# Altium PCB ChrisByrd-IoT_Product.PcbDoc (part 6 of 6)
Units mil, origin at the board's own origin, x right, y up, seen from the top; angles counter-clockwise.
Board outline 5314.96 x 4000 mil, 2 copper layers (Top Layer, Bottom Layer), stack 57 mil thick; 306 components, 230 nets, 1006 pads, 531 vias.
Unrouted connection lines stored in the file: 476.
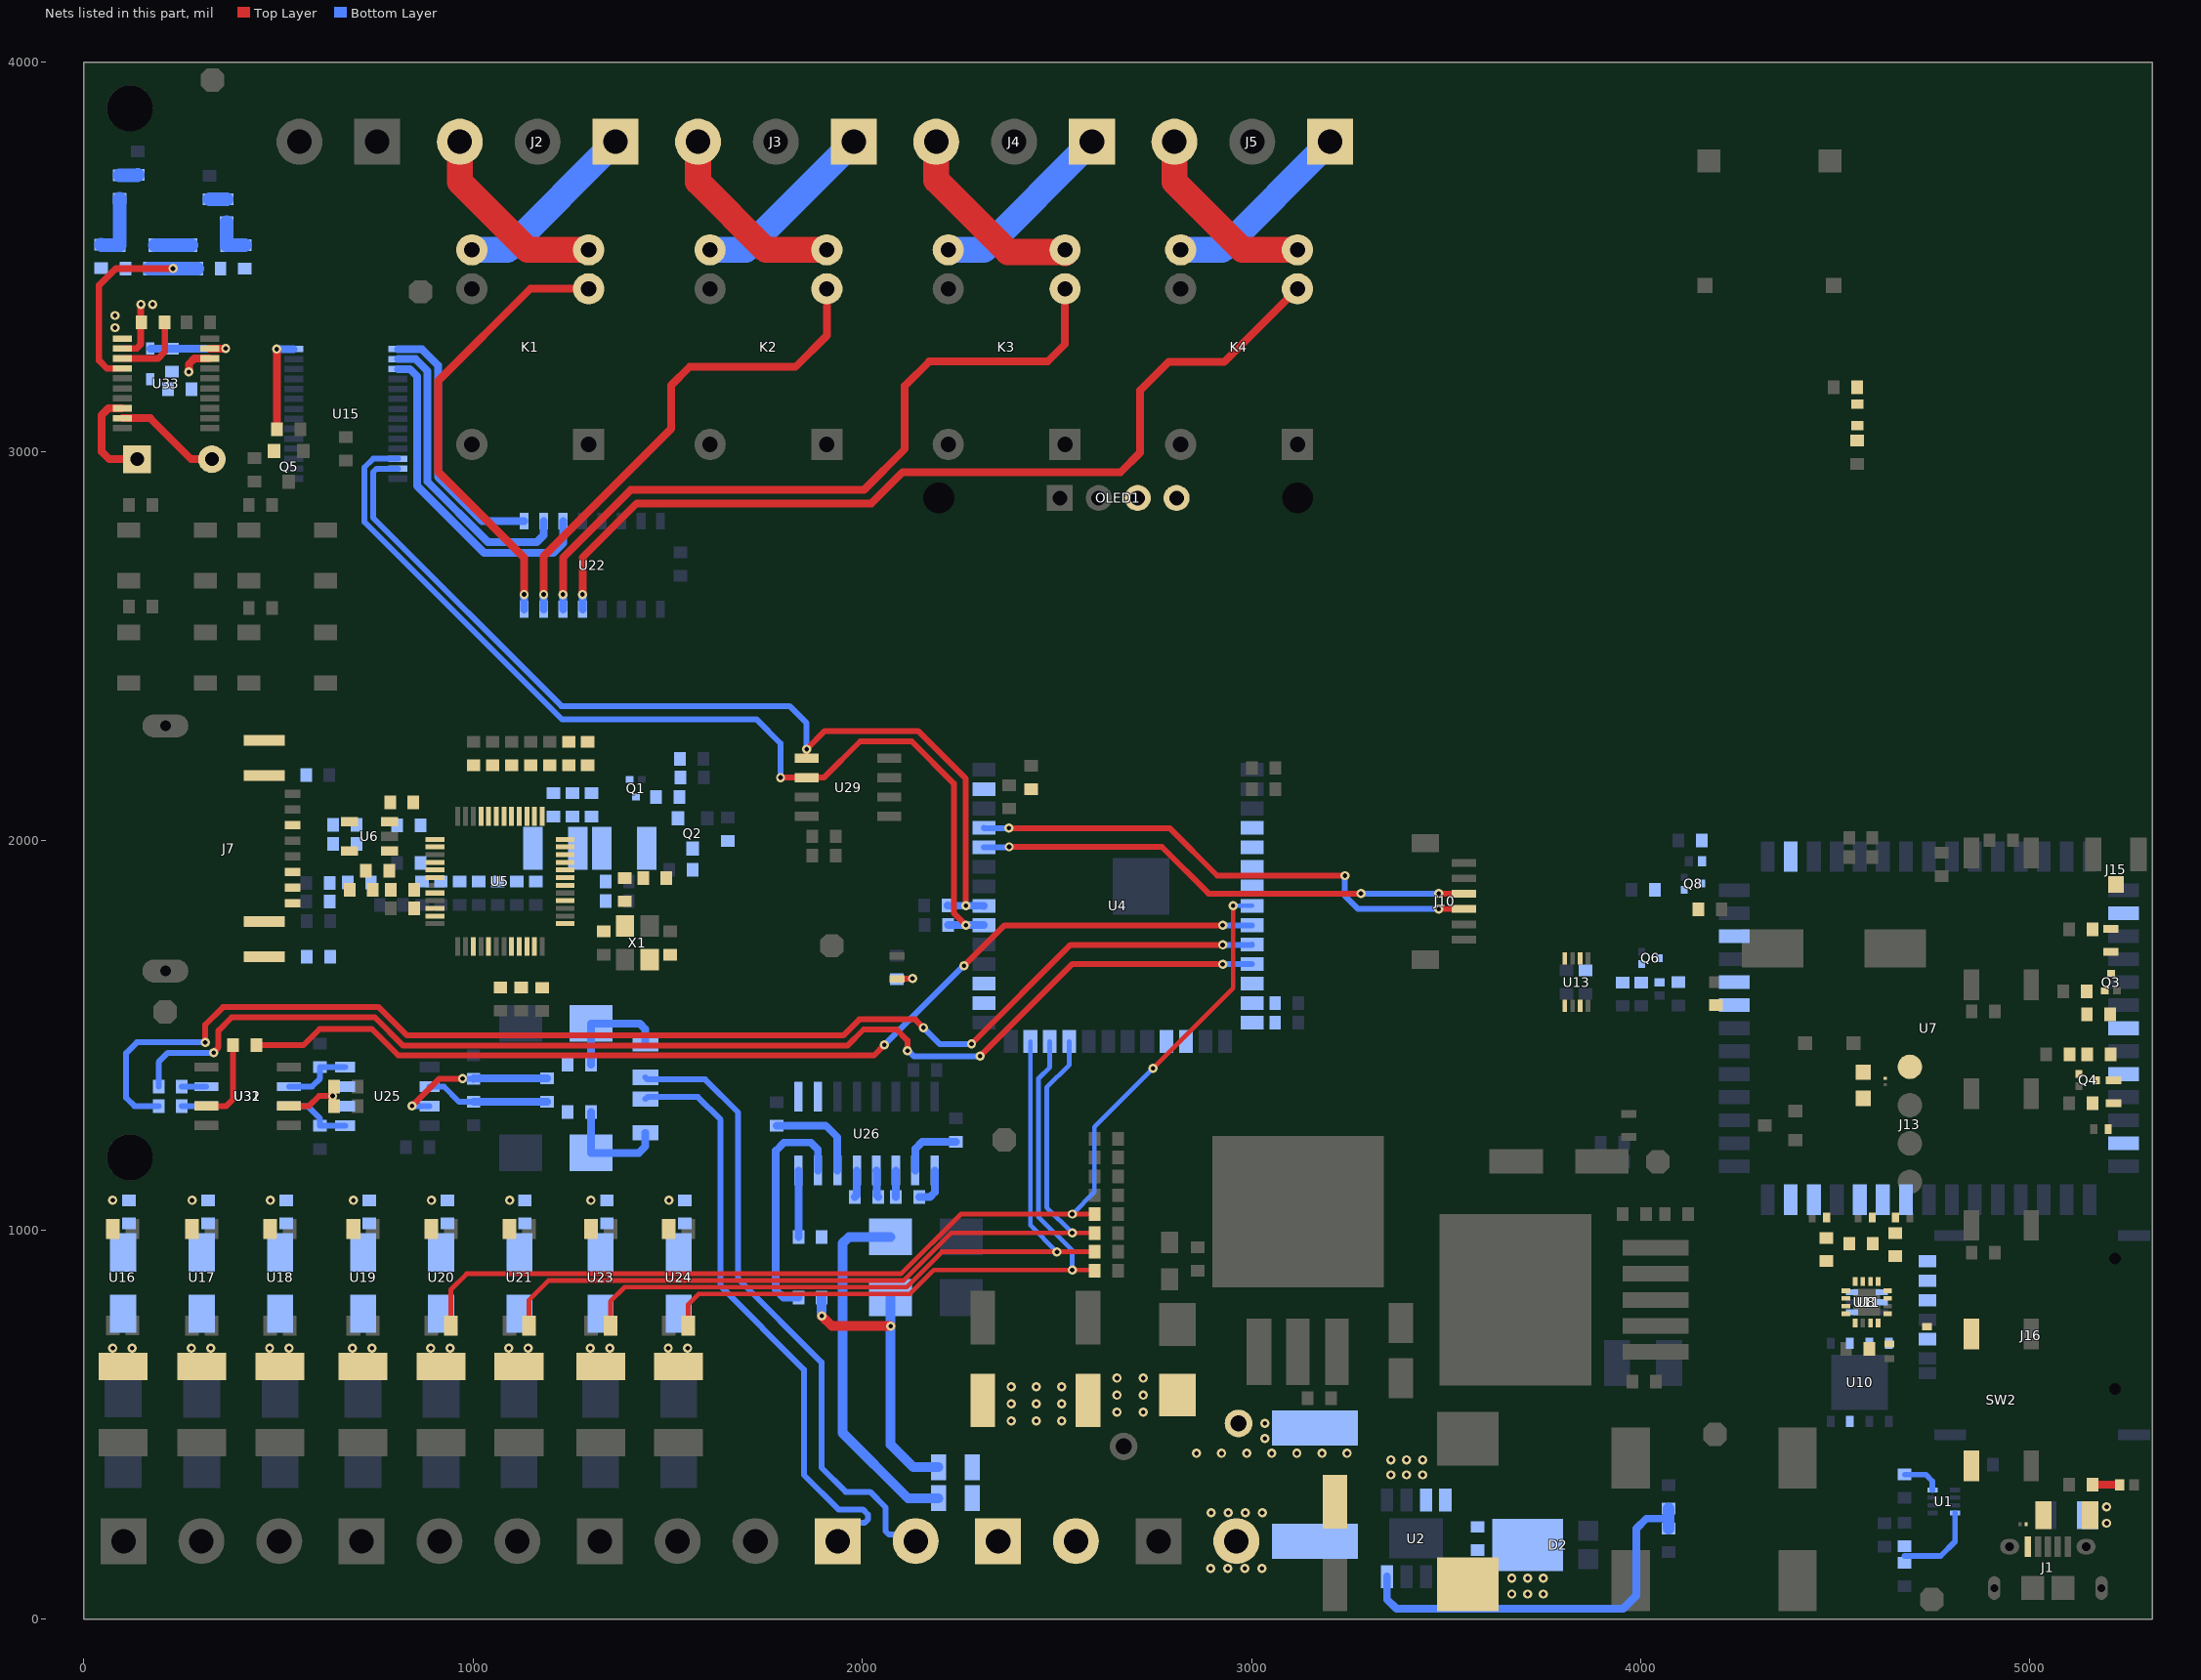
[diagram p3: the nets of this part, all layers, seen from the top]

## Via types
v1: diameter 23.62, hole 11.81, Top Layer to Bottom Layer, 531 vias

## Nets (pads, with @x,y where several pads share a name; then routed paths per layer and width w, separated by ;. In a path a pad name is that pad's centre, name@x,y a point inside that pad or via, vN(x,y) a via of type N, cw(c..) or ccw(c..) an arc to the next point about the centre after c; other vN are vias at no path point) (continued)
IO5: R88.2 U4.8 U20.4 | length 2839.1
  Top Layer w12: U20.4@943,753.97 943,846.7 983.3,887 2099.86,887 2253.14,1040.29 v1(2539.41,1040.29) R88.2@2597.02,1040.29 ; v1(2747,1415) 2953,1621 v1(2953,1832.61)
  Bottom Layer w12: v1(2539.41,1040.29) 2596.49,1097.37 2596.49,1264.49 v1(2747,1415) ; v1(2953,1832.61) U4.8@3001.49,1832.61
IO6: R89.2 U4.23 U21.4 | length 2132.8
  Top Layer w12: U21.4@1144,753.97 1144,819.7 1194.3,870 2106.9,870 2228.75,991.86 v1(2539.41,991.86) R89.2@2597,991.86
  Bottom Layer w12: U4.23@2531.8,1483.39 2531.8,1423.55 2473.8,1365.55 2473.8,1057.47 v1(2539.41,991.86)
IO7: R93.2 U4.25 U23.4 | length 1927.1
  Top Layer w12: U23.4@1353,753.97 1353,816.25 1389.75,853 2113.94,853 2204.37,943.43 v1@2500,943.43 ; v1(2500.11,943.43) R93.2@2597,943.43
  Bottom Layer w12: U4.25@2431.8,1483.39 2431.8,1011.74 v1(2500.11,943.43)
IO8: R94.2 U4.24 U24.4 | length 1770.8
  Top Layer w12: U24.4@1553,753.97 1553,808.7 1579.54,835.24 2122.37,835.24 2184,896.88 v1(2539.41,896.88) 2595.12,896.88 R94.2@2597,895
  Bottom Layer w12: U4.24@2481.8,1483.39 2481.8,1417.37 2452.42,1387.99 2452.42,1033.61 2539.41,946.63 v1(2539.41,896.88)
LAN_ACT: J7.11 R21.1
LAN_LINK: J7.9 R20.1
LEARN: C15.2 C16.1 SW2.3 SW2.4 U4.39
LED_DATA: Q5.2 R110.2 U15.28 | length 249.5
  Top Layer w20: v1(495.95,3263.03) 496.21,3262.77 496.21,3057.54 R110.2@496.46,3057.28
  Bottom Layer w20: v1(495.95,3263.03) U15.28@539.46,3263.03
LINKLED: R20.2 U5.25
MCU_RX: U4.28 U13.8
MCU_TX: U4.29 U13.1
MUX/ENCRYP_SCL: R62.1 U4.32 U15.12 U29.6 | length 2626.2
  Top Layer w15: v1(1790.07,2162) U29.6@1857,2162 1901.48,2162 1994.48,2255 2127.02,2255 2235.12,2146.9 2235.12,1813.94 v1(2266.26,1782.8)
  Bottom Layer w15: U15.12@807.18,2981.53 743.53,2981.53 721,2959 721,2819 1229,2311 1729,2311 1790.07,2249.93 v1(1790.07,2162)
  Bottom Layer w20: R62.1@2220,1783 2220.2,1782.8 v1(2266.26,1782.8) 2312.31,1782.8 U4.32@2312.51,1782.61
MUX/ENCRYP_SDA: R63.1 U4.33 U15.13 U29.5 | length 2505.7
  Top Layer w15: U29.5@1857,2212 v1(1857,2235) 1904,2282 2143,2282 2266,2159 v1(2266,1832.8)
  Bottom Layer w15: U15.13@807.18,2955.94 752.32,2955.94 743.53,2947.16 743.53,2829.47 1227,2346 1813,2346 1857,2302 v1(1857,2235)
  Bottom Layer w20: R63.1@2219.49,1832.99 2219.68,1832.8 v1(2266,1832.8) 2312.32,1832.8 U4.33@2312.51,1832.61
NC_1: J2.1 K1.4 | length 484.2
  Bottom Layer w66.93: K1.4@997,3518 1088,3518 J2.1@1366,3796
NC_2: J3.1 K2.4 | length 484.2
  Bottom Layer w66.93: K2.4@1609,3518 1700,3518 J3.1@1978,3796
NC_3: J4.1 K3.4 | length 484.2
  Bottom Layer w66.93: K3.4@2221,3518 2312,3518 J4.1@2590,3796
NC_4: J5.1 K4.4 | length 499.2
  Bottom Layer w66.93: K4.4@2818,3518 2924,3518 J5.1@3202,3796
NetC3_1: C3.1 D2.2 L1.1 U2.8
  other v1: 3668.74,64 3709.24,64 3749.74,64 3668.74,105 3709.24,105 3749.74,105
NetC3_2: C3.2 U2.1
NetC19_1: C19.1 Q2.1 R6.1 R7.1
NetC20_2: C20.2 FB2.1 Q2.3 R8.1
NetC30_2: C30.2 R15.1 R18.2
NetC31_2: C31.2 R17.1 R19.2
NetC34_2: C34.2 U5.22
NetC35_2: C35.2 U5.20
NetC36_2: C36.2 R25.1 U5.30 X1.1
NetC37_2: C37.2 R26.1 X1.3
NetC41_2: C41.2 R36.2 U7.10
NetC49_1: C49.1 U7.55
NetC50_1: C50.1 R68.1 | length 47.4
  Bottom Layer w35: R68.1@92,3710 138,3710 C50.1@139,3711
NetC51_1: C51.1 R75.1 | length 44
  Bottom Layer w35: C51.1@323,3648.61 R75.1@367,3648.61
NetC55_2: C55.2 R37.1 U7.11
NetC56_2: C56.2 R39.2 U7.13
NetC59_1: C59.1 U26.4 | length 70
  Bottom Layer w20: U26.4@2036.06,1152.43 2036.89,1151.61 2036.89,1088.68 C59.1@2041.06,1084.51
NetC59_2: C59.2 U26.5 | length 70
  Bottom Layer w20: C59.2@1981.06,1084.51 1985.23,1088.68 1985.23,1151.61 U26.5@1986.06,1152.43
NetC60_1: C60.1 U26.1 | length 101.1
  Bottom Layer w20: C60.1@2146.06,1084.5 2174.34,1084.51 2186.06,1096.22 U26.1@2186.06,1152.43
NetC60_2: C60.2 U26.3 | length 67.9
  Bottom Layer w20: C60.2@2086.06,1084.5 U26.3@2086.06,1152.43
NetC61_1: C61.1 U26.6 | length 254.1
  Bottom Layer w20: C61.1@1780,1268 1906.06,1268 1936.06,1238 U26.6@1936.06,1152.43
NetC62_1: C62.1 U26.2 | length 167.8
  Bottom Layer w20: U26.2@2136.06,1152.43 2136.06,1208.06 2153.99,1225.99 C62.1@2240.81,1225.99
NetD1_1: D1.1 F1.1 J1.1
NetD4_2: D4.2 F14.2 R100.1 | length 933.7
  Bottom Layer w25: D4.2@2072.88,981.77 1966.06,981.77 1949,964.7 1949,478.7 2117.43,310.27 F14.2@2195.97,310.27
NetD5_1: D5.1 R72.2
NetD5_2: D5.2 R70.2 U33.19 | length 234.8
  Top Layer w20: U33.19@323.45,3264.5 v1(364.43,3264.52)
  Bottom Layer w20: D5.2@170.63,3264.49 R70.2@226.23,3264.52 ; R70.2@226.23,3264.52 v1(364.43,3264.52)
NetD9_1: D9.1 D10.1 | length 94.2
  Bottom Layer w35: D9.1@182.22,3530 D10.1@276.45,3530
NetD9_2: D9.2 R68.2 R69.1 | length 167.3
  Bottom Layer w35: R69.1@44.98,3530.99 45.75,3530.22 91.45,3530.22 D9.2@91.66,3530 91.78,3530 92,3530.22 R68.2@92,3650
NetD10_2: D10.2 R75.2 R76.1 | length 104.6
  Bottom Layer w35: R75.2@367,3588.61 D10.2@367,3530 R76.1@413,3530
NetD11_2: D11.2 F27.2 R101.1 | length 759.6
  Top Layer w25: v1(1896,778.47) 1921.76,752.71 v1(2072.88,752.71)
  Bottom Layer w25: v1(1896,778.47) R101.1@1896,825.71 ; D11.2@2072.88,825.71 v1(2072.88,752.71) 2072.88,448.13 2131.19,389.82 F27.2@2195.97,389.82
NetD12_2: D12.2 F28.1 R102.2 | length 288.1
  Bottom Layer w20: R102.2@1303.09,1424.63 1303.09,1529.54 D12.2@1303.55,1530 1428.3,1530 1442.02,1516.28 1442.02,1479.28 F28.1@1443,1478.31
NetD13_2: D13.2 F30.1 R103.2 | length 286.1
  Bottom Layer w20: R103.2@1303.09,1302.24 1303.09,1197.71 D13.2@1303.24,1197.56 1425.56,1197.56 1443,1215 F30.1@1443,1249.34
NetD14_1: D14.1 F2.1
  other v1: 74.4,696 124.4,696
NetD14_2: D14.2 R77.2
NetD16_1: D16.1 F3.1
  other v1: 276.41,695.7 326.41,695.7
NetD16_2: D16.2 R80.2
NetD19_1: D19.1 F5.1 J13.1
NetD20_1: D20.1 F6.1
  other v1: 477.41,695.7 527.41,695.7
NetD20_2: D20.2 R81.2
NetD22_1: D22.1 F7.1
  other v1: 690.41,695.7 740.41,695.7
NetD22_2: D22.2 R82.2
NetD24_1: D24.1 F8.1
  other v1: 891.41,695.7 941.41,695.7
NetD24_2: D24.2 R83.2
NetD26_1: D26.1 F9.1
  other v1: 1091.41,695.7 1141.41,695.7
NetD26_2: D26.2 R84.2
NetD28_1: D28.1 F10.1
  other v1: 1301.41,695.7 1351.41,695.7
NetD28_2: D28.2 R85.2
NetD30_1: D30.1 F11.1
  other v1: 1501.41,695.7 1551.41,695.7
NetD30_2: D30.2 R86.2
NetF1_2: F1.2 FB1.1
  other v1: 5197,246 5197,287.79
NetF4_1: F4.1 J12.2
  other v1: 2895.24,130 2939.12,130 2983,130 3026.88,130 2896,273 2939.88,273 2983.76,273 3027.64,273
NetL2_1: L2.1 R64.1
NetL2_2: L2.2 SB1.1
NetLED1_1: LED1.1 R4.2 | length 69.9
  Top Layer w20: R4.2@5160.26,344.7 LED1.1@5230.13,344.69
NetLED2_1: LED2.1 R40.2
NetLED2_2: LED2.2 Q3.3
NetLED3_1: LED3.1 R43.2
NetLED3_2: LED3.2 Q4.3
NetLED6_2: LED6.2 R92.2 | length 81.3
  Top Layer w15: LED6.2@2089,1644.47 2089.64,1645.11 2128.36,1645.11 v1(2129,1645.75)
  Bottom Layer w15: R92.2@2089,1644 2089.88,1644.88 2128.12,1644.88 v1(2129,1645.75)
NETLIGHT: R44.1 U7.52
NetQ1_3: Q1.3 R6.2
NetQ3_1: Q3.1 R41.2 R42.2
NetQ4_1: Q4.1 R44.2 R45.2
NetQ6_1: Q6.1 R47.2 R48.2
NetQ8_1: Q8.1 R50.2 R51.2
NetR1_1: R1.1 U1.8 | length 101.1
  Bottom Layer w14: R1.1@4677.9,371 4732.1,371 4749.19,353.91 U1.8@4749.19,331.22
NetR12_2: R12.2 U5.2
NetR13_2: R13.2 U5.1
NetR15_2: R15.2 U5.6
NetR17_2: R17.2 U5.5
NetR22_1: R22.1 U5.43
NetR23_1: R23.1 U5.44
NetR24_1: R24.1 U5.45
NetR25_2: R25.2 R26.2 U5.31
NetR27_2: R27.2 U5.38
NetR28_2: R28.2 U5.39
NetR29_2: R29.2 U5.40
NetR30_2: R30.2 U5.41
NetR31_2: R31.2 U5.42
NetR32_2: R32.2 U5.23
NetR33_2: R33.2 U5.10
NetR52_1: R52.1 R53.2 U2.4 | length 1041.2
  Bottom Layer w20: U2.4@3348,108.67 3348,50.47 3372.25,26.22 3954.97,26.22 3989,60.25 3989,232.32 4014.58,257.9 4072,257.9
  Bottom Layer w30: R53.2@4072,231.8 4072,257.9 R52.1@4072,284
NetR58_1: R58.1 R99.2 R102.1 U25.7 | length 421.6
  Top Layer w15: v1(843,1318) 913.51,1388.51 v1(973.12,1388.51)
  Bottom Layer w15: v1(843,1318) U25.7@888.27,1318 ; v1(973.12,1388.51) R99.2@1001.28,1388.51
  Bottom Layer w20: R99.2@1001.28,1388.51 1001.58,1388.8 1189.6,1388.8 R58.1@1189.89,1389.09
NetR58_2: R58.2 R103.1 R104.1 U25.6 | length 317.7
  Bottom Layer w15: U25.6@888.27,1368 925.28,1368 964.16,1329.12 R104.1@1001.28,1329.15
  Bottom Layer w20: R104.1@1001.28,1329.15 R58.2@1189.89,1329.09
NetR69_2: R69.2 R73.1 U33.1
  other v1: 80.54,3317.98 80.54,3349.5
NetR70_1: R70.1 R72.1 U33.18 | length 79.7
  Top Layer w20: v1(269.95,3204.28) 269.95,3224.56 284.29,3238.9 U33.18@323.44,3238.9
NetR74_1: R74.1 R76.2 R109.1 U33.2 | length 154.6
  Top Layer w17: U33.2@99.03,3264.49 99.26,3264.72 135.99,3264.72 146.39,3275.12 v1@146.39,3378
  other v1: 147,3378 177,3378
NetR77_1: R77.1 U16.2
  other v1: 74.4,1076
NetR80_1: R80.1 U17.2
  other v1: 278,1075.7
NetR81_1: R81.1 U18.2
  other v1: 479,1075.7
NetR82_1: R82.1 U19.2
  other v1: 692.68,1075.7
NetR83_1: R83.1 U20.2
  other v1: 893,1075.7
NetR84_1: R84.1 U21.2
  other v1: 1094,1075.7
NetR85_1: R85.1 U23.2
  other v1: 1303,1075.7
NetR86_1: R86.1 U24.2
  other v1: 1503,1075.7
NetR100_2: R100.2 U26.8 | length 170.7
  Bottom Layer w20: R100.2@1836,981.77 U26.8@1836.03,1152.4
NetR101_2: R101.2 U26.7 | length 602.1
  Bottom Layer w20: R101.2@1836,825.71 1797.57,825.71 1777.88,845.4 1777.88,1202.94 1799.13,1224.19 1868.14,1224.19 1886.06,1206.27 U26.7@1886.06,1152.43
NetR105_1: R105.1 U31.2 | length 62.6
  Bottom Layer w15: R105.1@252,1318 U31.2@314.63,1318
NetR106_1: R106.1 U31.3 | length 62.6
  Bottom Layer w15: R106.1@252,1368 U31.3@314.63,1368
NetR108_1: R108.1 U32.7 | length 214.6
  Top Layer w15: U32.7@314.64,1318 366.27,1318 383,1334.72 R108.1@383,1474
NetR109_2: R109.2 U33.3 | length 192.1
  Top Layer w17: U33.3@99.03,3238.9 191.03,3238.9 208,3255.86 R109.2@208,3332
NetU33_8: U33.8 X2.1 | length 253.3
  Top Layer w20: U33.8@99.03,3110.94 63.44,3110.94 45.94,3093.44 45.94,2999.65 65.59,2980 X2.1@136.94,2980
NetU33_9: U33.9 X2.2 | length 273.7
  Top Layer w20: U33.9@99.03,3085.35 170.63,3085.35 275.99,2980 X2.2@329.06,2980
NO_1: J2.3 K1.3 | length 491.7
  Top Layer w66.93: J2.3@966,3796 966,3692.65 1140.65,3518 K1.3@1282,3518
NO_2: J3.3 K2.3 | length 491.7
  Top Layer w66.93: J3.3@1578,3796 1578,3692.65 1752.65,3518 K2.3@1894,3518
NO_3: J4.3 K3.3 | length 507.4
  Top Layer w66.93: J4.3@2190,3796 2190,3697 2374.27,3512.73 2518.44,3512.73 K3.3@2521,3510.17
NO_4: J5.3 K4.3 | length 491.7
  Top Layer w66.93: J5.3@2802,3796 2802,3692.65 2976.65,3518 K4.3@3118,3518
OLED_SCL: OLED1.3 R91.1 U4.13
OLED_SDA: OLED1.4 R90.1 U4.14
PR1: R2.1 R3.2 U1.4 | length 218.1
  Bottom Layer w15: 4677.9,162 4770.54,162 4807.46,198.91 U1.4@4807.46,272.16
PWRKEY: C44.2 D8.2 Q8.3 U7.30
RD_N: C31.1 J7.6 U6.1
RD_P: C30.1 J7.3 U6.5
RE/DE/RS485: R108.2 U4.9 | length 2741.6
  Top Layer w15: R108.2@443,1474 564,1474 606,1516 740,1516 807.79,1448.21 2030.21,1448.21 v1(2057,1475) ; v1(2261.29,1678.41) 2365.49,1782.61 v1(2926,1782.61)
  Bottom Layer w15: v1(2057,1475) v1@2260.41,1678.41 ; v1(2926,1782.61) U4.9@3001.49,1782.61
RE/DE/RS485/T: R96.2 R97.2 U25.2 U25.3 U32.2 | length 122.9
  Top Layer w15: U32.2@527.24,1318 578.65,1318 604.57,1343.92 v1(639.41,1343.92)
RELAY_1: U15.1 U22.1 | length 675.5
  Bottom Layer w20: U15.1@807.18,3263.03 868.4,3263.03 910.49,3220.94 910.49,2933.76 1023.37,2820.88 U22.1@1131.32,2820.88
RELAY_2: U15.2 U22.2 | length 779.2
  Bottom Layer w20: U15.2@807.18,3237.44 852.17,3237.44 883.21,3206.39 883.21,2922.16 1038.49,2766.89 1163.65,2766.89 1181.32,2784.55 U22.2@1181.32,2820.88
RELAY_3: U15.3 U22.3 | length 851.9
  Bottom Layer w20: U15.3@807.18,3211.85 837.35,3211.85 856.14,3193.06 856.14,2911.3 1028.23,2739.21 1206.21,2739.21 1231.32,2764.32 U22.3@1231.32,2820.88
RET_K1: K1.2 U22.16 | length 1162.9
  Top Layer w20: v1(1131.32,2632.69) 1131.32,2726.73 910.49,2947.57 910.49,3181.49 1147,3418 K1.2@1297,3418
  Bottom Layer w20: U22.16@1131.32,2594.5 v1(1131.32,2632.69)
RET_K2: K2.2 U22.15 | length 1284.2
  Top Layer w20: v1(1181.32,2632.69) 1181.32,2730.72 1509.04,3058.44 1509.04,3170.04 1556.1,3217.1 1828.1,3217.1 1909,3298 K2.2@1909,3418
  Bottom Layer w20: U22.15@1181.32,2594.5 v1(1181.32,2632.69)
RET_K3: K3.2 U22.14 | length 1886.7
  Top Layer w20: v1(1231.32,2632.69) 1231.32,2727.4 1405.35,2901.42 2004.42,2901.42 2109.34,3006.34 2109.34,3168.39 2171.96,3231 2476,3231 2521,3276 K3.2@2521,3418
  Bottom Layer w20: U22.14@1231.32,2594.5 v1(1231.32,2632.69)
RET_K4: K4.2 U22.13 | length 2349.3
  Top Layer w20: v1(1281.32,2632.69) 1281.32,2727.4 1420.67,2866.75 2023.75,2866.75 2104.01,2947.01 2664.01,2947.01 2714,2997 2714,3156.89 2787.11,3230 2930,3230 K4.2@3118,3418
  Bottom Layer w20: U22.13@1281.32,2594.5 v1(1281.32,2632.69)
RF_ANT: J15.1 U7.45
RS232_PORT.RS232_RX: F27.1 J19.2
RS232_PORT.RS232_TX: F14.1 J19.1
RS485_N: F28.2 J17.2 | length 1633
  Bottom Layer w15: F28.2@1443,1391.69 1448.37,1386.32 1596.32,1386.32 1681,1301.64 1681,873.64 1895,659.64 1895,389 1957.44,326.56 2019.9,326.56 2059.78,286.68 2059.78,225.41 2068.57,216.62 2120.66,216.62 J17.2@2137.28,200
RS485_P: F30.2 J17.1 | length 1540.8
  Bottom Layer w15: F30.2@1443,1335.96 1448.37,1341.32 1577.68,1341.32 1636,1283 1636,855 1850,641 1850,370.36 1938.81,281.56 2001.26,281.56 2014.78,268.04 2014.78,255.61 2005.99,246.82 1984.1,246.82 J17.1@1937.28,200
RST_GSM: C43.2 D7.2 Q6.3 U7.24
RXD: J10.4 U4.36 | length 1283.1
  Top Layer w15: v1(2377.24,1984) 2769.62,1984 2889.61,1864.01 v1(3281.01,1864.01) ; v1(3481.4,1864.01) J10.4@3545.38,1864.01
  Bottom Layer w15: U4.36@2312.51,1982.61 2313.21,1983.3 2376.55,1983.3 v1(2377.24,1984) ; v1(3281.01,1864.01) v1(3481.4,1864.01)
RXD/RS485/RS232: R105.2 U4.10 | length 3353.6
  Top Layer w15: v1(311.91,1481.59) 311.91,1526.76 357.15,1572 757.69,1572 830.62,1499.06 1951.06,1499.06 1992.62,1540.62 2135.82,1540.62 v1(2156.88,1519.55) ; v1(2280.71,1477.64) 2535.06,1732 v1(2926,1732)
  Bottom Layer w15: R105.2@192,1318 130,1318 109,1339 109,1454 136.59,1481.59 v1(311.91,1481.59) ; v1(2156.88,1519.55) 2198.79,1477.64 v1(2280.71,1477.64) ; v1(2926,1732) 2926.3,1732.3 3001.19,1732.3 U4.10@3001.49,1732.61
RXD/RS485/RS232/T: R95.2 U25.1 U26.9 U31.7 | length 176.4
  Bottom Layer w15: U31.7@527.23,1318 574.45,1318 607.19,1285.25 R95.2@607.19,1267.25 607.56,1267.63 671.36,1267.63 U25.1@671.73,1268
SIM_CLK: R37.2 U11.8
SIM_CLK_B1: U10.6 U11.9
SIM_CLK_B2: J16.C3 U8.3 U11.7
SIM_DATA: R36.1 U11.12
SIM_DATA_B1: U10.3 U11.13
SIM_DATA_B2: J16.C7 U8.4 U11.11
SIM_RST: R39.1 U11.4
SIM_RST_B1: U10.7 U11.5
SIM_RST_B2: J16.C2 U8.1 U11.3
SIM_SELECT: R66.1 U7.26 U11.2
SIM_VCC_B1: C63.2 U10.8 U11.1
SIM_VCC_B2: C74.2 J16.C1 U8.5 U11.15
SIM_VDD: U7.14 U11.16
STATUS: R41.1 U7.50
TD_N: J7.2 R10.1 R13.1 U6.4
TD_P: J7.1 R9.1 R12.1 U6.3
TXD: J10.3 U4.37 | length 1349.9
  Top Layer w15: v1(2376.55,2032) 2790,2032 2912,1910 v1(3240,1910) ; v1(3481.4,1824.32) J10.3@3545.7,1824.32
  Bottom Layer w15: U4.37@2312.51,2032.61 2312.82,2032.3 2376.24,2032.3 v1(2376.55,2032) ; v1(3240,1910) 3240,1858 3273.68,1824.32 v1(3481.4,1824.32)
TXD/RS485/RS232: R106.2 U4.11 | length 3136.1
  Top Layer w15: v1(333.95,1454.91) 333.95,1457.24 346,1469.29 346,1512 380,1546 747.63,1546 820.63,1473 1961.77,1473 2003.38,1514.62 2088.2,1514.62 2116.16,1486.65 v1(2116.16,1459.82) ; v1(2302.39,1446.07) 2538.93,1682.61 v1(2926,1682.61)
  Bottom Layer w15: R106.2@192,1368 192,1431.06 215.85,1454.91 v1(333.95,1454.91) ; v1(2116.16,1459.82) 2118.5,1459.82 2132.25,1446.07 v1(2302.39,1446.07) ; v1(2926,1682.61) U4.11@3001.49,1682.61
TXD/RS485/RS232/T: R98.2 U25.4 U26.10 U31.6 | length 182
  Bottom Layer w15: U31.6@527.23,1368 586,1368 607,1389 607,1417.68 R98.2@607.19,1417.87 607.26,1417.93 671.67,1417.93 U25.4@671.73,1418
USB_VBUS: F5.2 U7.9
VCC: C5.1 C7.1 C8.1 D18.2 F4.2 R112.1 U2.7
  other v1: 3358,370.2 3398,370.2 3439.4,370.2 3358,409 3398,409 3439.4,409 2858.5,425.6 2923,425.6 2987.5,425.6 3052,425.6 3116.5,425.6 3181,425.6 3245.49,425.6 3034.41,464.06 3034.41,502.53 2382.5,509.24 2447.25,509.24 2512,509.24 2654.5,531.16 2722,531.16 2382.5,553.08 2447.25,553.08 2512,553.08 2654.5,575 2722,575 2382.5,596.93 2447.25,596.93 2512,596.93 2654.5,618.85 2722,618.85
VDD: C28.2 C29.2 FB2.2 FB3.1 J7.10 J7.12 R14.2 R16.2 R22.2 R23.2 R24.2 U5.28
VDD_EXT: C42.2 C45.2 U7.23 U11.14 U13.3 U13.6
VDDA: C21.2 C22.2 C23.2 C24.2 C25.2 C26.2 C27.2 FB3.2 R9.2 R10.2 R11.2 U5.4 U5.8 U5.11 U5.15 U5.17 U5.21
VREF: R73.2 R74.2 U33.4 | length 593.4
  Top Layer w17: U33.4@99.03,3213.31 59.74,3213.31 39.1,3233.94 39.1,3427.1 82,3470 v1(229.08,3470)
  Bottom Layer w35: R73.2@167.41,3470 v1(229.08,3470) 290.74,3470 R74.2@291.25,3469.49
W5500_CS: U4.4 U5.32
W5500_INT: R14.1 U4.12 U5.36
W5500_MISO: U4.6 U5.34
W5500_MOSI: U4.7 U5.35
W5500_PWR_EN: Q1.1 U4.18
W5500_RST: R16.1 U4.17 U5.37
W5500_SCLK: U4.5 U5.33
pads on no net: ANT1.3 ANT1.4 J1.2 J1.3 J1.4 J7.7 J16.C6 J16.CD J16.MH LED10.2 OLED1.15 U2.2 U2.3 U2.5 U4.15 U4.16 U4.26 U4.30 U5.7 U5.12 U5.13 U5.18 U5.24 U5.26 U5.46 U5.47 U7.2 U7.4 U7.5 U7.12 U7.17 U7.18 U7.19 U7.20 U7.21 U7.25 U7.27 U7.36 U7.37 U7.40 U7.41 U7.42 U7.48 U7.49 U7.51 U8.6 U10.2 U10.4 U10.5 U11.10 U11.17 U15.4 U15.5 U15.6 U15.7 U15.8 U15.11 U15.14 U15.19 U15.20 U22.5 U22.6 U22.7 U22.10 U22.11 U22.12 U26.11 U26.12 U26.13 U26.14 U29.1 U29.2 U29.3 U29.7 U32.3 U32.6 U33.7 U33.16

## Other copper
Top Layer:
  rectangle net 3V3: 624.69,1462.87 718.12,1492.87
  rectangle net RE/DE/RS485/T: 628.12,1300.39 658.12,1385.39
  rectangle net 3V3: 2122.17,1682.61 2242,1763.87
  rectangle net GND: 3483.2,549.07 4650.71,581
  rectangle net GND: 160.86,2778.4 190.86,2879.62
  rectangle net GND: 161.04,2518.1 191.04,2619.32
  rectangle net GND: 469.13,2514.28 499.13,2615.5
  rectangle net GND: 469.13,2778.4 499.13,2879.62
  rectangle net GND: 1636.38,22 1835.28,470
  rectangle net GND: 4489.82,541.77 4542.66,711.96
  rectangle net GND: 4983.47,374 5300.12,432.66
  rectangle net GND: 4983.47,353.92 5022.84,432.66
  rectangle net GND: 4625.71,541.77 4650.71,678.31
  rectangle net GND: 4489.82,541.77 4650.71,661.62
  rectangle net GND: 1636.38,294 2711,470
  rectangle net GND: 2113.94,294 2247.6,811.7
  rectangle net GND: 1006.83,1516.92 1195.19,1578
  rectangle net GND: 18.15,1406.18 367.28,1429.81
  rectangle net GND: 18.15,1406.18 280,1696
  rectangle net GND: 18.15,728.68 47,1696
  rectangle net 3V3: 616.32,3022.12 690.82,3074.78
  rectangle net 3V3: 1681.81,2033.26 1887.51,2073.81
  rectangle net 3V3: 1827,1880.18 2175,1931
  rectangle net 3V3: 1826.49,1890.27 1887.51,2073.81
  rectangle net 3V3: 2112.12,1730.69 2175,1931
  rectangle net GND: 2886,2165 3016.01,2200.32
  rectangle net GND: 2986.01,2115.1 3016.01,2204.27
  rectangle net 3V3: 3046.01,2115.1 3112,2204.27
  rectangle net 3V3: 3514.21,1693 3609,1755.42
  rectangle net 3V3: 2186.89,1178.85 2242,1732.61
  rectangle net 3V3: 688.12,1178.84 718.12,1492.87
  rectangle net 3V3: 826.5,1178.84 973.12,1284.15
  rectangle net 3V3: 1535.28,976.41 1570.72,1247.22
  rectangle net 3V3: 1335.28,976.41 1370.72,1247.21
  rectangle net 3V3: 1126.28,976.41 1161.72,1247.07
  rectangle net 3V3: 925.28,976.41 960.72,1247.56
  rectangle net 3V3: 724.97,976.41 760.4,1247.13
  rectangle net 3V3: 511.28,976.41 546.72,1279.81
  rectangle net 3V3: 310.29,976.41 345.72,1279.81
  rectangle net 3V3: 231.88,1178.85 557.75,1279.81
  rectangle net 3V3: 231.88,1178.85 2402,1247.32
  rectangle net 3V3: 2328,1178.85 2402,1322.67
  rectangle net 3V3: 2328,1264.13 2696.64,1322.67
  rectangle net GND: 5255.32,15.99 5300.12,431
  rectangle net GND: 2277.61,705.4 2611.5,843.2
  rectangle net 3V3: 2642,1216.5 2672,1251.5
  rectangle net 3V3: 2642.01,939.64 2811.74,1241.65
  rectangle net 3V3: 2642,877.5 2696.64,1322.67
  rectangle net 3V3: 2767.25,939.64 2931.8,1241.65
  rectangle net 3V3: 2767.25,939.64 3339.47,1241.65
  rectangle net 5V: 372.71,2515.28 439.13,2616.5
  rectangle net 5V: 64.35,2778.4 130.77,2879.62
  rectangle net GND: 283.18,2330.2 342.24,2424.73
  rectangle net GND: 283.18,2328.93 650.6,2369.2
  rectangle net GND: 591.55,2330.2 650.6,2424.72
  rectangle net GND: 591.55,2648.48 650.6,2743
  rectangle net GND: 283.18,2704 650.6,2744.27
  rectangle net GND: 283.18,2648.48 342.24,2743
  rectangle net GND: 1446.75,728.38 1520.72,779.56
  rectangle net GND: 1246.75,728.38 1320.72,779.56
  rectangle net GND: 1037.75,728.38 1111.72,779.56
  rectangle net GND: 836.75,728.38 910.72,779.56
  rectangle net GND: 636.43,728.38 710.4,779.56
  rectangle net GND: 422.75,728.38 496.72,779.56
  rectangle net GND: 221.75,728.38 295.72,779.56
  rectangle net GND: 18.15,728.68 92.12,779.86
  rectangle net NetR86_1: 1485.28,976.41 1520.72,1090.7
  rectangle net NetR85_1: 1285.28,976.41 1320.72,1090.7
  rectangle net NetR84_1: 1076.28,976.41 1111.72,1090.7
  rectangle net NetR83_1: 875.28,976.41 910.72,1090.7
  rectangle net NetR82_1: 674.97,976.41 710.4,1090.7
  rectangle net NetR81_1: 461.28,976.41 496.72,1090.7
  rectangle net NetR80_1: 260.29,976.41 295.72,1090.7
  rectangle net NetR77_1: 56.69,976.71 92.12,1091
  rectangle net NetD30_1: 1465.01,613.99 1590.99,713.7
  rectangle net NetD28_1: 1265.01,613.99 1390.99,713.7
  rectangle net NetD26_1: 1055.01,613.99 1180.99,713.7
  rectangle net NetD24_1: 855.01,613.99 980.99,713.7
  rectangle net NetD22_1: 654.01,613.99 779.99,713.7
  rectangle net NetD20_1: 441.01,613.99 566.99,713.7
  rectangle net NetD16_1: 240.01,613.99 365.99,713.7
  rectangle net NetD14_1: 38.01,614.29 163.99,714
  rectangle net INPUT_8: 1465.01,138.73 1590.99,488.01
  rectangle net INPUT_7: 1265.01,138.73 1390.99,488.01
  rectangle net INPUT_6: 1055.01,138.73 1180.99,488.01
  rectangle net INPUT_5: 855.01,138.73 980.99,488.01
  rectangle net INPUT_4: 654.01,138.73 779.99,488.01
  rectangle net INPUT_3: 441.01,138.73 566.99,488.01
  rectangle net INPUT_2: 240.01,138.73 365.99,488.01
  rectangle net INPUT_1: 38.01,140.95 163.99,488.31
  rectangle net GND: 2762.26,665.05 2879,909.72
  rectangle net GND: 2113.94,665.05 3065.35,811.7
  rectangle net GND: 3002.07,549.51 3065.35,771.65
  rectangle net GND: 2987.5,601.65 3065.35,771.65
  rectangle net GND: 3002.07,549.51 3159.48,584.51
  rectangle net 3V3: 3089.47,602.83 3149.47,1241.65
  rectangle net 5V: 4602.09,305.79 4725.99,338.42
  rectangle net 5V: 3189.48,549.51 3415.05,670.2
  rectangle net 5V: 3189.47,549.51 3249.47,771.65
  rectangle net 5V: 3304,490 3415.05,670.2
  rectangle net GND: 3610.87,1287.69 3988.82,1307.37
  rectangle net GND: 3610.87,1144.5 3748.66,1307.37
  rectangle net GSM_PWR: 3831.34,1144.5 3988.82,1248.32
  rectangle net GSM_PWR: 3831.34,1144.5 4189,1211.47
  rectangle net GSM_PWR: 4107.02,996 4195.77,1211.47
  rectangle net GSM_PWR: 4143.32,866.89 4195.77,1211.47
  rectangle net GSM_PWR: 4107.02,1022.5 4189,1057.5
  rectangle net GSM_PWR: 3953.28,866.89 4189,907.05
  rectangle net GND: 3483.2,1022.5 3968.99,1057.5
  rectangle net GND: 3483.2,549.07 3994,627.46
  rectangle net ADJ: 3998.99,1022.5 4077.02,1057.5
  rectangle net ADJ: 3953.28,933.82 4123.36,973.98
  rectangle net ADJ: 4013.99,933.82 4059,1057.48
  rectangle net GND: 3483.2,549.07 3873.36,1040.12
  rectangle net GND: 3483.2,799.96 4123.36,840.12
  rectangle net 5V: 4120,722 4228,786
  rectangle net 5V: 3953.28,733.03 4228,773.19
  rectangle net GND: 4955.35,238.76 4978.23,249.44
  rectangle net GND: 4805.1,15.99 4974.43,249.44
  rectangle net GND: 3799.8,108.32 4974.43,249.44
  rectangle net GND: 4805.1,15.99 5300.12,146.29
  rectangle net GND: 5136.65,15.99 5300.12,212.39
  rectangle net GND: 5088.81,159.24 5203.38,212.39
  rectangle net NetF1_2: 5133.65,231.12 5217.92,302.78
  rectangle net NetD1_1: 4986.1,221.89 5069.71,255.57
  rectangle net NetD1_1: 5013.34,221.89 5070.4,302.78
  rectangle net NetD1_1: 4986.1,159.24 5002.98,248.21
  rectangle net 5V_BUCK: 4453,313.95 4587.66,402.64
  rectangle net 5V_BUCK: 4233,334.74 4587.66,402.64
  rectangle net GND: 3477.26,297.76 3887.2,370.2
  rectangle net 5V_BUCK: 3924.79,334.74 4452.21,531.91
  rectangle net 5V_BUCK: 3477.26,394.11 4023.21,531.91
  rectangle net GND: 3799.8,19.78 4687.75,297.76
  rectangle net GND: 3709,182.17 4023.21,297.76
  rectangle net NetC3_1: 3477.26,20.09 3769,157.89
  rectangle net GND: 3284.36,182.17 3887.2,325.3
  rectangle net GND: 3284.36,19.8 3446.1,325.3
  rectangle net VCC: 3168,352.49 3455.58,425.6
  rectangle net GND: 3067.84,19.8 3446.1,182.17
  rectangle net GND: 3067.53,19.8 3150,389.04
  rectangle net GND: 2633.27,311 3150,389.04
  rectangle net GND: 2659,19.8 3245.5,90.62
  rectangle net GND: 2633.27,250.95 2839.96,389.04
  rectangle net GND: 2633.27,250.95 2711,479.11
  rectangle net GND: 2659,19.8 2840,389.04
  rectangle net VCC: 3168,224 3257,532.56
  rectangle net VCC: 2277.61,502.53 2950.65,630.6
  rectangle net VCC: 2724.24,493 2950.65,630.6
  rectangle net VCC: 2277.61,492.8 2615.38,630.6
  rectangle net VCC: 2762.26,410 2950.65,630.6
  rectangle net VCC: 2762.26,409 3257,532.56
  rectangle net NetF4_1: 2877,109 3043,287
  rectangle net 5V: 372.76,3021.75 401.91,3068.03
  rectangle net 5V: 23.71,2515.28 68,2817.49
  rectangle net 5V: 372.71,2515.28 453.48,2554.65
  rectangle net 5V: 23.71,2515.28 131.04,2619.32
  rectangle net 5V: 23.71,2515.28 145.39,2554.65
  rectangle net 5V: 23.71,2778.4 145.39,2817.77
  rectangle net 5V: 372.71,2778.4 439.13,2879.62
  rectangle net 5V: 372.71,2778.4 453.75,2832.16
  rectangle net HV_LED_DATA: 420.5,2903.93 542.61,2940.15
  rectangle net LED_DATA: 472.92,2982.67 511.46,3074.78
  rectangle net 3V3: 541.46,2982.12 645,3074.78
  rectangle net GND: 598.15,2922.08 690.82,2952.8
  rectangle net GND: 655.82,2922.08 690.82,2992.12
  rectangle net 5V: 298.83,3036.39 401.91,3068.03
  rectangle net 5V: 298.83,3281.81 348.04,3349.42
  rectangle net GND: 30,3153.86 123.64,3195.98
  rectangle net GND: 74.42,3032 159,3068.03
  rectangle net NetR74_1: 130,3359 197.96,3395
  rectangle net NetR69_2: 62.48,3281.81 123.64,3301.95
  rectangle net NetR69_2: 62.48,3281.81 99.03,3367.67
  rectangle net NetR74_1: 129.78,3314.5 163,3395
Bottom Layer:
  rectangle net 3V3: 589.69,1462.87 657.99,1492.87
  rectangle net RE/DE/RS485/T: 625.12,1304.22 697.32,1381.78
  rectangle net NetR58_2: 1172.39,1314.09 1258.09,1344.09
  rectangle net NetR58_2: 1228.09,1284.74 1258.09,1344.09
  rectangle net NetR58_1: 1228.09,1374.09 1258.09,1442.13
  rectangle net NetR58_1: 1172.39,1374.09 1258.09,1404.09
  rectangle net GND: 4627.62,493.67 4647.7,678.91
  rectangle net GND: 15,3029.71 142.52,3195
  rectangle net GND: 15,3029.71 160.4,3093
  rectangle net GND: 15,2263 43,3195
  rectangle net GND: 18.15,1506 1177.57,1577.24
  rectangle net GND: 112.54,2503 349,2580.82
  rectangle net GND: 427,2520 509,2989.8
  rectangle net GND: 15,2263 110,2563
  rectangle net GND: 15,2263 509,2563
  rectangle net GND: 397,1599 509,2327
  rectangle net GND: 2269.73,665.05 2309.1,1300.99
  rectangle net GND: 4489.82,537.18 4647.7,678.91
  rectangle net GND: 4753.57,459.31 5308.69,486.87
  rectangle net GND: 4890,379.47 5301,486.87
  rectangle net GND: 5226.02,459.31 5308.69,486.87
  rectangle net GND: 5232,11 5301,486.87
  rectangle net GND: 4806.58,11 4855.51,40.8
  rectangle net GND: 4837.28,11 5301,50.09
  rectangle net GND: 4877.36,11 5301,216
  rectangle net GND: 862.68,1404.22 913.86,1577.24
  rectangle net GND: 862.68,1433.51 1177.57,1577.24
  rectangle net GND: 18.15,1506 509,1696
  rectangle net GND: 284.12,1406.19 557.74,1429.81
  rectangle net GND: 993,844 1065.55,1182
  rectangle net GND: 813,1150.31 1177.26,1182
  rectangle net GND: 813,1150.31 843,1229.5
  rectangle net GND: 1037,1150.31 1177.26,1299.15
  rectangle net 3V3: 1577.07,2039.89 1753.76,2073.81
  rectangle net 3V3: 1577.07,2039.89 1671.93,2227.28
  rectangle net 3V3: 2112.12,1765.5 2175,1850.49
  rectangle net GND: 2886,2164.89 3031.02,2200.32
  rectangle net 3V3: 2971.96,2114.89 3135.62,2150.32
  rectangle net 3V3: 3080.01,2114.89 3135.62,2205
  rectangle net 3V3: 3796,1740 3844,1773
  rectangle net 3V3: 3796,1651.24 3827.18,1773
  rectangle net 3V3: 3567,1651 3609,1755.42
  rectangle net 3V3: 3105.62,1651.24 3827.18,1681.24
  rectangle net 3V3: 3105.62,851.65 3135.62,2205
  rectangle net 3V3: 2176,1365.43 2242.62,1427.5
  rectangle net 3V3: 284.12,1192.25 624.69,1222.25
  rectangle net 3V3: 284.12,1192.25 557.74,1279.81
  rectangle net 3V3: 873,1194.5 903,1284.12
  rectangle net 3V3: 826.5,1251.15 1018.78,1284.15
  rectangle net GND: 1469.51,2725.69 1550.82,2842.53
  rectangle net 5V: 1469.51,2572.85 1550.82,2695.69
  rectangle net GND: 2195,665.05 2309.1,1029.01
  rectangle net GND: 1626,19.8 1805,627.97
  rectangle net GND: 1626,19.8 2852.37,122
  rectangle net GND: 2125.32,1270.99 2146.89,1380.58
  rectangle net GND: 2125.32,1270.99 2258.31,1291.36
  rectangle net GND: 2223.31,1270.99 2309.1,1300.99
  rectangle net NetD4_2: 1881,934.52 2128,1029.01
  rectangle net RS232_PORT.RS232_RX: 2486,140.94 2608.06,423.29
  rectangle net RS232_PORT.RS232_RX: 2262.9,356.36 2608.06,423.29
  rectangle net RS232_PORT.RS232_TX: 2289.94,140.94 2408.06,343.73
  rectangle net RS232_PORT.RS232_TX: 2262.9,276.8 2408.06,343.73
  rectangle net 5V: 362.59,2572.18 410.16,2635
  rectangle net 5V: 53,2596 410.16,2635
  rectangle net 5V: 53,2576 100.57,2635
  rectangle net 5V: 64.35,2841.12 409.13,2900
  rectangle net NetD5_1: 160.4,3142.32 231.08,3177.32
  rectangle net NetD5_1: 160.4,3142.32 180.87,3201.5
  rectangle net NetR70_1: 261.08,3142.32 291.08,3219.52
  rectangle net NetR70_1: 208.73,3189.52 291.08,3219.52
  rectangle net GND: 221.75,517.43 250.56,881.03
  rectangle net GND: 422.75,517.43 451.56,881.03
  rectangle net GND: 636.43,517.43 665.24,881.03
  rectangle net GND: 836.75,517.43 865.56,881.03
  rectangle net GND: 1037.75,517.43 1066.56,881.03
  rectangle net GND: 1246.75,517.43 1275.56,881.03
  rectangle net GND: 18.15,844 1474.55,881.03
  rectangle net GND: 1446.75,517.43 1475.56,881.03
  rectangle net GND: 18.15,517.73 46.96,1696
  rectangle net NetD30_1: 1483.69,670.38 1569.12,833.48
  rectangle net NetD28_1: 1283.69,670.38 1369.12,833.48
  rectangle net NetD26_1: 1074.69,670.38 1160.12,833.48
  rectangle net NetD24_1: 873.69,670.39 959.12,833.48
  rectangle net NetD22_1: 673.37,670.38 758.81,833.48
  rectangle net NetD20_1: 459.69,670.38 545.12,833.48
  rectangle net NetD16_1: 258.69,670.38 344.12,833.48
  rectangle net NetR86_1: 1485.28,1060.7 1562.04,1090.7
  rectangle net NetR85_1: 1285.28,1060.7 1362.04,1090.7
  rectangle net NetR84_1: 1076.28,1060.7 1153.04,1090.7
  rectangle net NetR83_1: 875.28,1060.7 952.04,1090.7
  rectangle net NetR82_1: 674.97,1060.7 751.72,1090.7
  rectangle net NetR81_1: 461.28,1060.7 538.04,1090.7
  rectangle net NetR80_1: 260.29,1060.7 337.04,1090.7
  rectangle net NetR77_1: 56.69,1061 133.44,1091
  rectangle net NetD30_2: 1494.54,892.53 1561.47,1030.71
  rectangle net NetD28_2: 1294.54,892.53 1361.47,1030.71
  rectangle net NetD26_2: 1085.54,892.53 1152.47,1030.71
  rectangle net NetD24_2: 884.54,892.53 951.47,1030.71
  rectangle net NetD22_2: 684.22,892.53 751.15,1030.71
  rectangle net NetD20_2: 470.54,892.53 537.47,1030.71
  rectangle net NetD16_2: 269.54,892.53 336.47,1030.71
  rectangle net NetD14_2: 67.54,892.83 134.46,1031
  rectangle net NetD14_1: 56.69,670.68 142.12,833.77
  rectangle net GND: 18.15,517.41 1805,627.97
  rectangle net INPUT_8: 1466.28,140.95 1584.39,446.87
  rectangle net INPUT_7: 1266.28,140.95 1384.39,446.87
  rectangle net INPUT_6: 1054.61,140.95 1172.72,446.87
  rectangle net INPUT_5: 854.61,140.95 972.72,446.87
  rectangle net INPUT_4: 654.61,140.95 772.72,446.87
  rectangle net INPUT_3: 442.95,140.95 561.06,446.87
  rectangle net INPUT_2: 242.95,140.95 361.06,446.87
  rectangle net INPUT_1: 42.95,140.95 161.06,446.87
  rectangle net GND: 4133,19.78 4695.4,99
  rectangle net GND: 4133,19.78 4643.46,200.94
  rectangle net GND: 4133,19.78 4471,284
  rectangle net 5V: 3296.05,500.14 3883,619.79
  rectangle net GND: 3483.2,643 3991.18,1033.2
  rectangle net 5V: 3296.05,500.14 3463.79,669.99
  rectangle net 5V: 3490,475.92 3883,619.79
  rectangle net 5V: 3490,475.92 4225.8,582.46
  rectangle net 3V3: 2899.47,851.65 3339.47,1241.65
  rectangle net GND: 3881.74,643 3911.74,1240.94
  rectangle net GSM_PWR: 3941.74,1143.87 4020.12,1240.94
  rectangle net GND: 3905.68,598.94 3991.18,1033.2
  rectangle net 5V: 4021.07,484 4225.8,787
  rectangle net 5V: 4021.07,484 4453,702.06
  rectangle net 5V: 4133,446.94 4453,628
  rectangle net 5V: 4376.28,402.99 4453,628
  rectangle net 5V: 4376.28,402.99 4647.7,473.09
  rectangle net 5V: 4602.13,288.91 4647.7,473.09
  rectangle net 5V: 4602.13,288.91 4695.4,338.45
  rectangle net 5V: 4602.13,305.63 4725.99,338.42
  rectangle net NetF1_2: 5120.34,231.12 5215.66,302.78
  rectangle net 5V_USB: 4966.31,260.29 5068.38,294.15
  rectangle net 5V_USB: 5013.26,231.12 5068.38,302.78
  rectangle net 5V: 4837.86,315.28 5050,353.92
  rectangle net 5V: 4837.86,305.63 4994.32,337.12
  rectangle net PR1: 4660.4,129 4695.4,201.94
  rectangle net 5V_USB: 4703.84,272.16 4729.08,298.92
  rectangle net 5V_USB: 4703.84,285.94 4762.38,297.75
  rectangle net 5V_BUCK: 4736,230.94 4785.79,278.07
  rectangle net 5V_BUCK: 4638.62,230.94 4785.79,260.29
  rectangle net 5V_BUCK: 4771.71,230.94 4785.79,297.75
  rectangle net 5V_BUCK: 4771.71,285.94 4820.65,297.75
  rectangle net 5V: 4660.4,296.24 4695.4,326
  rectangle net 5V: 4660.4,305.63 4994.32,317.44
  rectangle net 5V_BUCK: 4499,230.94 4695.4,278.07
  rectangle net 5V_BUCK: 4453,313.95 4587.66,389
  rectangle net 5V_BUCK: 4125.97,334.74 4351.18,420
  rectangle net 5V_BUCK: 3639,359 4089.5,461.28
  rectangle net 5V_BUCK: 4499,230.94 4587.66,389
  rectangle net 5V_BUCK: 3827,329 4089.5,461.28
  rectangle net GND: 3839.17,54 3924.79,252.2
  rectangle net NetC3_1: 3482.21,275.7 3598.76,338.1
  rectangle net NetC3_1: 3618.69,50.65 3799.8,338.1
  rectangle net NetC3_1: 3563.76,221.55 3799.8,338.1
  rectangle net NetC3_2: 3563.76,79.05 3598.76,191.55
  rectangle net NetC3_2: 3482.21,79.05 3598.76,138.3
  rectangle net GND: 2750,19.8 2852.37,383.64
  rectangle net GND: 3293,19.8 3311.6,383.64
  rectangle net GND: 2659,305.33 3311.6,383.64
  rectangle net GND: 3293,155.56 3491.94,258.44
  rectangle net GND: 3293,19.8 3316.77,258.44
  rectangle net GND: 2659,19.8 3316.77,90.62
  rectangle net GND: 2659,19.8 2820.06,478.91
  rectangle net GND: 2633.27,250.95 2820.06,481
  rectangle net GND: 3354.06,155.56 3491.94,258.44
  rectangle net GND: 3382.21,155.56 3413.79,334.95
  rectangle net VCC: 3432.21,275.7 3463.79,362.3
  rectangle net VCC: 3332.21,352.49 3463.79,484.34
  rectangle net VCC: 2843,402 3463.79,484.34
  rectangle net VCC: 2843,402 3002.07,635.04
  rectangle net VCC: 2496,500.36 3002.07,635.04
  rectangle net VCC: 2366,492.8 2615.38,635.04
  rectangle net VCC: 2843,402 3273.24,546.4
  rectangle net NetF4_1: 2877,109 3273.24,287
  rectangle net 5V: 380.21,2841.12 409.13,3068.03
  rectangle net 5V: 348.04,3029.71 409.13,3068.03
  rectangle net GND: 682,2922.02 699.64,3041
  rectangle net GND: 682,3024.45 831.79,3040.98
  rectangle net GND: 427,2922.08 699.64,2989.8
  rectangle net 3V3: 616.32,2999 645,3066.72
  rectangle net 3V3: 514.86,2998.86 645,3015.39
  rectangle net 3V3: 616.32,3050.04 831.79,3066.57
  rectangle net NetR74_1: 130,3359 405.38,3395
  rectangle net NetR74_1: 364.43,3359 405.38,3486.99
  rectangle net NetR69_2: 62.48,3281.81 99.03,3485.99
  rectangle net NetR69_2: 27.48,3452.5 122.41,3487.5
  rectangle net NetR74_1: 336.25,3451.99 430.5,3486.99

## Silkscreen, mask and mechanical layers (free items; w line width, h text height)
Top Overlay:
  lines w10: 3346.47,2031.27 3346.46,3999.77 ; 3346.47,2031.5 5314.97,2031.5 5314.96,4000
  text "DTMF" at 193.05,3835.63 h100
  text "5V" at 709.27,3368.73 h100
  text "RESET" at 5127.37,1803.88 h100 r90
  text "FAULT" at 1568.52,1688.56 h100
  text "GND" at 251,1519.56 h100
  text "GSM_PWR" at 4099.21,1214.78 h100 r90
  text "3V3" at 2136.84,1189.8 h100
  text "CONFIG" at 5127.74,949.41 h100 r90
  text "5V-B" at 4225.8,510.77 h100 r90
  text "LEARN" at 5127.37,427.46 h100 r90
  text "5V-USB" at 4789,90 h100 r90
Dimensions:
  lines w5: 4807.93,686.66 4938.93,686.66 4938.93,940.65 4807.93,940.65 4807.93,686.66
Board Outline:
  lines w10: 0,2000 2657.48,2000 ; 2657.48,1244.1 2657.48,4000 ; 0,0 5314.96,0 5314.96,4000 3338.58,4000 3338.58,2919.85 3279.53,2919.85 3279.53,4000 0,4000 0,0 ; 2299.09,2236.31 3015.09,2236.31 3015.09,2480.01 2299.09,2480.01 2299.09,2236.31

## Dimensions
0,4000 to 0,0 on Dimensions
0,4000 to 5314.96,4000 on Dimensions

## Text inside footprints (layer, text, board x,y; h text height)
J1: Top Overlay "Board Edge" at 4952.47,13.77 h19.68
J7: Top Overlay "Board Cutout" at 156,1751 h39.37 r90; Top Overlay "PCB Edge" at 127,1687.07 h11.81 r180
J16: Bottom Overlay "Board Edge" at 5271,884 h30 r90